# Altium PCB Basic Datalogger-v1.0.PcbDoc (part 2 of 2)
Units mil, origin at the board's own origin, x right, y up, seen from the top; angles counter-clockwise.
Board outline 1637.8 x 1745.25 mil, 2 copper layers (Top Layer, Bottom Layer), stack 57 mil thick; 64 components, 61 nets, 279 pads, 114 vias.
Unrouted connection lines stored in the file: 1.
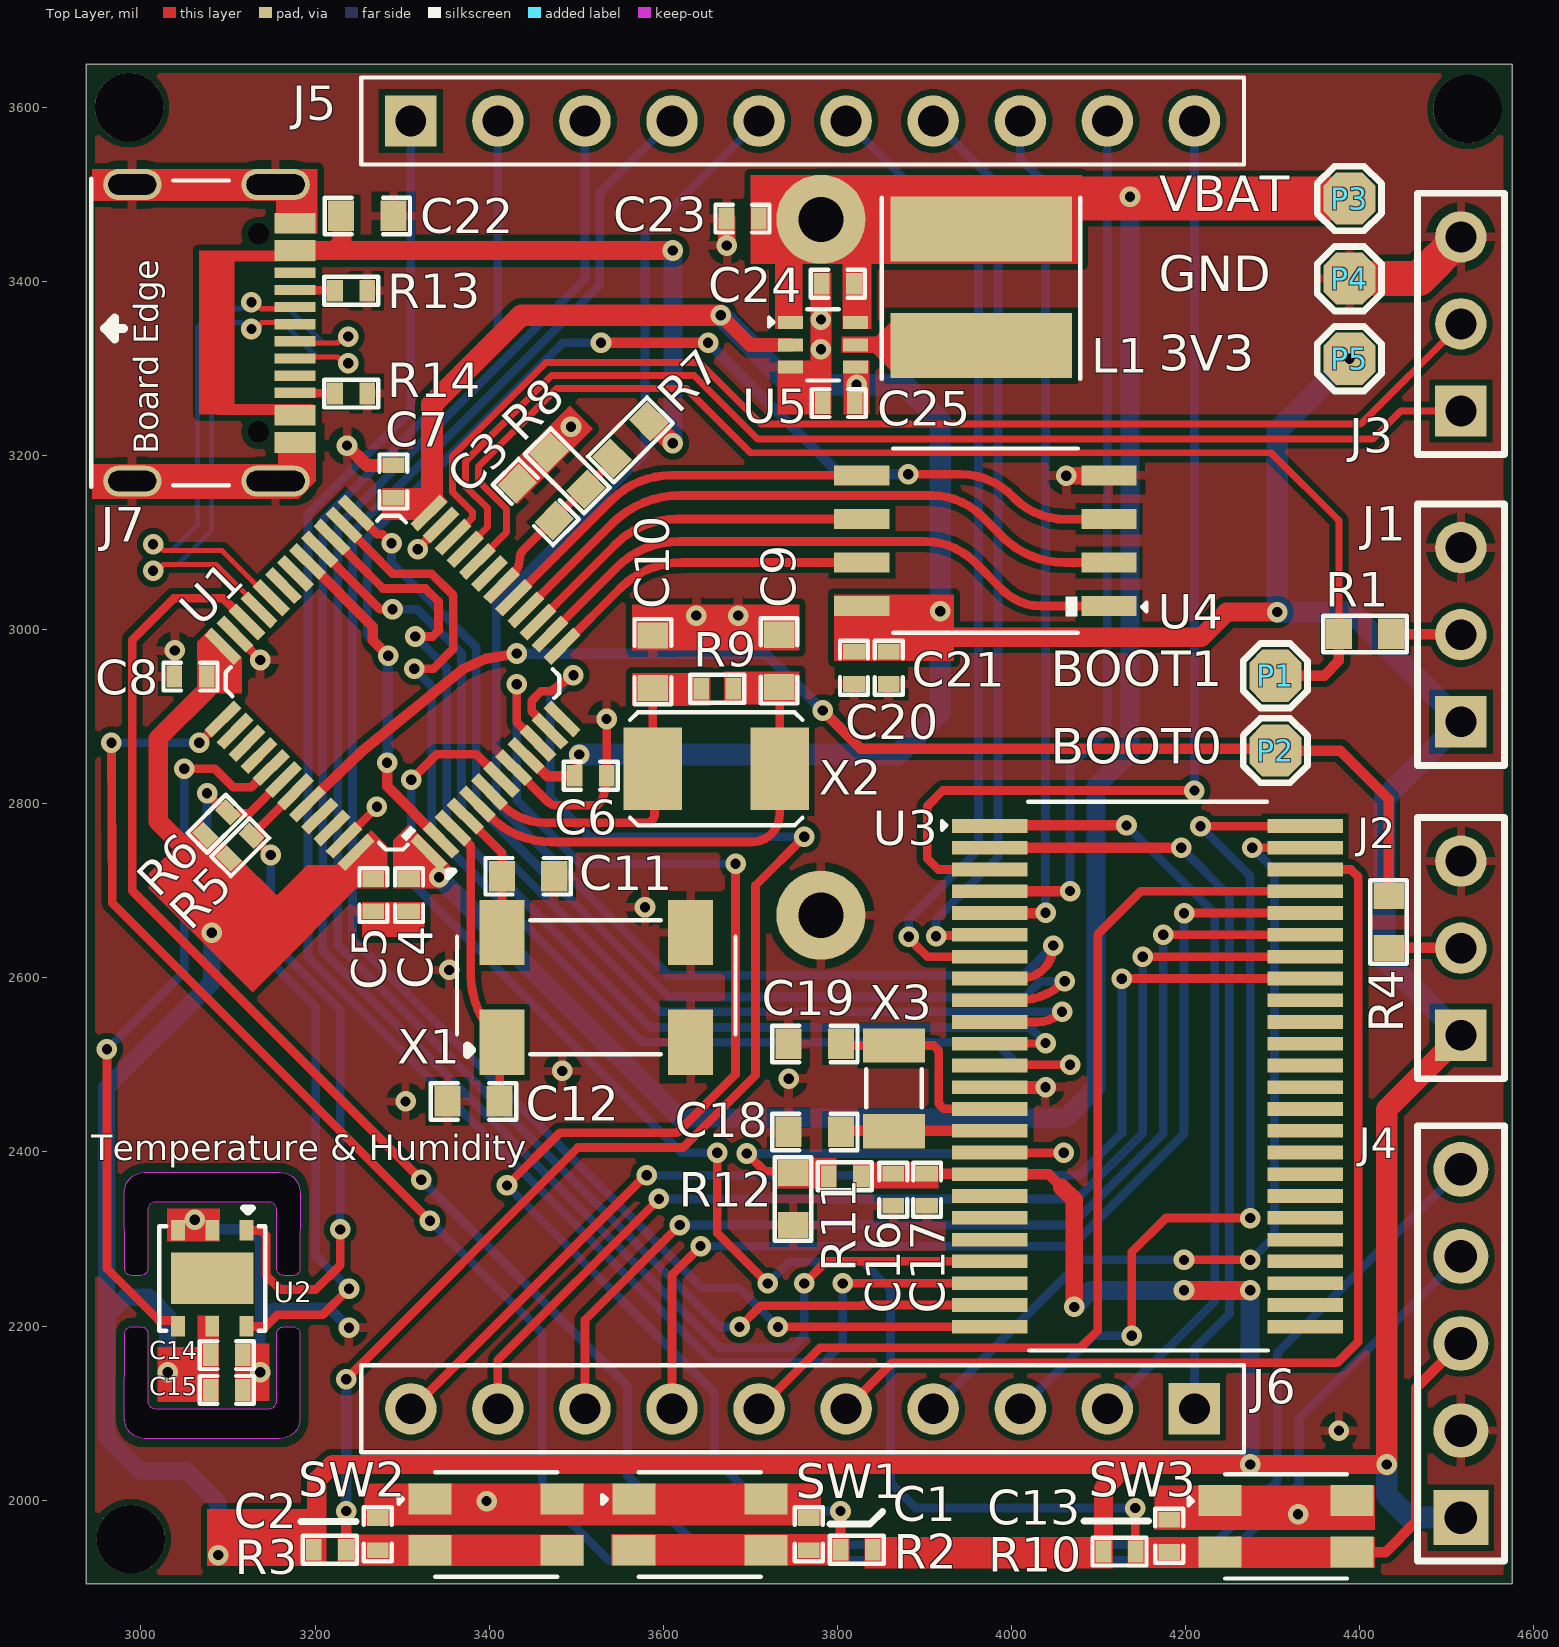
[diagram p0: Top Layer view]

## Via types
v1: diameter 23.62, hole 11.81, Top Layer to Bottom Layer, tented both sides, 113 vias
v2: diameter 23.62, hole 11.81, Top Layer to Bottom Layer, 1 vias

## Nets (pads, with @x,y where several pads share a name; then routed paths per layer and width w, separated by ;. In a path a pad name is that pad's centre, name@x,y a point inside that pad or via, vN(x,y) a via of type N, cw(c..) or ccw(c..) an arc to the next point about the centre after c; other vN are vias at no path point) (continued)
BUTTON2: (continued)
  Top Layer w10: v1(3236,2139) 3502,2405 3623,2405 3706,2488 3706,2706 v1(3762,2762) ; U1.11 3469.94,2885.16 3448.81,2906.29 3448.81,2918.19 3459.62,2929 3470.44,2929 3470.69,2929 v1(3496.81,2947.6)
  Top Layer w12: R3.1@3236,1943.5 v1(3236,1987.5)
  Bottom Layer w10: v1(3496.81,2947.6) 3470,2920.79 3470,2807 3515,2762 v1(3762,2762)
  Bottom Layer w12: v1(3236,1987.5) v1(3236,2139)
CS: U1.14 U4.1 | length 706.2
  Top Layer w10: U1.14 3546.97,3071.71 cw(c3617.68,3001) 3617.68,3101 3901,3101 cw(c3901,3021.33) 3957.33,3077.67 3989.62,3045.38 ccw(c4034,3089.77) 4034,3027 U4.1
CS_TN: U1.25 U3.9 | length 1264.1
  Top Layer w10: U1.25 U1.25@3259.75,3121.34 ; U1.25@3261.59,3121.34 U1.25@3259.75,3121.34 ; v1(3287.94,3098.99) 3277.43,3109.5 3271.6,3109.5 U1.25@3259.75,3121.34 ; U3.9 4008.59,2574.29 ccw(c4008.59,2648.41) v1(4061,2596)
  Bottom Layer w10: v1(3287.94,3098.99) 3287.94,3077.06 3385.21,2979.79 3385.21,2798.79 3606,2578 4015,2578 4033,2596 v1(4061,2596)
DAT_TN: U1.26 U3.12 | length 1410.3
  Top Layer w10: U1.26@3233.73,3119.95 3233.73,3119.53 3262.19,3091.07 3289.07,3064.19 3333.81,3064.19 3358.81,3039.19 3358.81,2977.81 3336,2955 v1(3314,2955) ; U3.12 4013.2,2496.42 4013.2,2500 v1(4067.19,2500)
  Top Layer w12: U1.26 U1.26@3233.73,3119.95
  Bottom Layer w10: v1(3314,2955) 3334.21,2934.79 3334.21,2767.79 3576,2526 3981,2526 4007,2500 v1(4067.19,2500)
DRDY: U1.41 U2.4 | length 840.2
  Top Layer w10: v1(2961,2518) 2961,2266.08 3020.7,2206.38 3039.76,2206.38 3042.63,2203.5 U2.4 ; v1(3049.81,2840) 3085,2840 3106,2819 3126.8,2819 U1.41@3149.37,2841.56
  Top Layer w12: U1.41@3149.37,2841.56 U1.41
  Bottom Layer w10: v1(2961,2518) 3049.81,2606.81 v1(3049.81,2840)
GND: C1.1 C2.1 C3.1 C4.1 C5.1 C6.1 C7.1 C8.1 C9.1 C10.1 C11.1 C12.1 C13.1 C14.1 C15.1 C16.1 C17.1 C18.1 C19.1 C20.1 C21.1 C22.1 C23.1 C24.1 C25.1 J1.3 J2.3 J3.3 J4.2 J7.A1/B12 J7.B1/A12 J7.S1 J7.S2 J7.S3 J7.S4 J8.2 P4.1 R8.1 R12.2 R13.2 R14.2 SW1.1 SW2.1 SW3.1 U1.8 U1.23 U1.35 U1.47 U2.2 U2.3 U3.13 U4.4 U5.3 X1.2 X1.3 | length 1151.6
  Top Layer w10: C8.1 3038.75,2946.25 3038.75,2975.75 v1(3039,2976) ; v1@3058,2311 3059,2311 v1@3060,2312 ; U1.35 3108.03,2994.32 3137,2965.35 v1(3137,2965) ; v1(3137.24,2147) 3139.24,2145 v1@3144,2145 ; U1.47 3233.31,2758.36 3271.13,2796.18 v1(3271.13,2796.5) ; 3287,2658 3287,2659 ; v1(3317.85,3092.27) 3317.85,3092.7 3344.66,3119.52 U1.23 ; U1.8 3468.03,2801.72 ccw(c3477,2810.69) 3477,2798 3523.77,2798 3529.63,2803.86 3534.84,2823.72 3534.84,2832 3534.92,2832.08 3534.92,2897.11 v1(3534.84,2897.19) ; v1(3638,3016) v1(3686,3016) ; v1@3742,2485 3743,2485 v1(3744,2484) ; U3.13 U3.13@3976.8,2476.19
  Top Layer w15: v1(3236.72,3211.28) 3259.5,3188.5 C7.1 ; U3.13@3975,2474.19 v1(4039,2474.19)
  Top Layer w20: v1(3673,3441) C23.1@3673,3471.5 ; v1(4062.81,3176.5) 4063.06,3176.75 4111.61,3176.75 U4.4
  Top Layer w40: P4.1 4468,3403 J3.3
  Bottom Layer w12: v1@3058,2311 3124,2311 3137.24,2297.76 3137.24,2206.24 ; v1(3137.24,2147) 3137.24,2206.24 ; v1(3239,2198) 3216,2221 3152,2221 3137.24,2206.24
  other v1: 4329,1984 3397,1999 4376,2080 3062,2322 3304,2458 3484,2493 3354,2609 3579,2681 3494,3233 3781,3322 3781,3356
HOLD: U1.13 U4.7 | length 379.7
  Top Layer w10: U1.13 3550.81,3047.71 cw(c3621.52,2977) 3621.52,3077 U4.7
MISO: U1.16 U4.2 | length 744.2
  Top Layer w10: U1.16 3541.29,3121.71 cw(c3619.25,3043.76) 3619.25,3154 3908,3154 cw(c3908,3071.92) 3966.04,3129.96 3989.71,3106.29 ccw(c4060.42,3177) 4060.42,3077 U4.2 U4.2@4111.36,3076.5
MOSI: U1.17 U4.5 | length 453.9
  Top Layer w10: U1.17 3441.75,3049.75 3540.96,3148.96 cw(c3608.66,3081.26) 3608.66,3177 U4.5
NetC3_2: C3.2 R7.1 R8.2 U1.18 | length 189
  Top Layer w10: U1.18 3428,3064.09 ccw(c3411.09,3081) 3435,3081 cw(c3449.49,3081) 3439.23,3091.23 ; 3441.24,3093.24 R7.1@3539.79,3191.79
NetJ1_2: J1.2 R1.1 | length 80.4
  Top Layer w12: R1.1 4436.5,2994.5 4515.5,2994.5 J1.2
NetJ2_2: J2.2 R4.2 | length 82.7
  Top Layer w12: R4.2@4433.5,2634.5 4515.5,2634.5 J2.2
NetJ3_1: J3.1 U1.21 | length 1349.1
  Top Layer w8: U1.21 3397.97,3117.58 3397.97,3139.34 3373,3164.31 3373,3193.21 3471.4,3291.61 3635.43,3291.61 3708.04,3219 4415,3219 4447,3251 J3.1
NetJ3_2: J3.2 U1.22 | length 1391.4
  Top Layer w8: U1.22 3380.9,3128.35 3380.9,3135.2 3358,3158.1 3358,3199.43 3465.18,3306.61 3641.65,3306.61 3712.25,3236 4401,3236 J3.2
NetJ7_A5: J7.A5 R13.1 | length 46.3
  Top Layer w10: J7.A5 3177.62,3389.5 3222.5,3389.5 R13.1
NetJ7_B5: J7.B5 R14.1 | length 46.2
  Top Layer w10: J7.B5 3177.57,3271.44 3222.56,3271.44 R14.1
NetL1_2: L1.2 U5.5
NetR11_1: R11.1 R12.1 U3.16 | length 555.1
  Top Layer w10: v1(3696,2398.19) 3716.44,2377.75 R11.1@3793.25,2377.75 ; U3.16@3975,2399.19 v1(4060,2399.19)
  Bottom Layer w10: v1(3696,2398.19) 4059,2398.19 v1(4060,2399.19)
OSC_IN: C9.2 R9.2 U1.5 X2.2 | length 526
  Top Layer w10: U1.5 3400.94,2785.29 ccw(c3471.65,2856) 3471.65,2756 3701.64,2756 ccw(c3701.64,2788.03) 3733.67,2788.03 X2.2 3733.67,2934 C9.2
OSC_OUT: C10.2 R9.1 U1.6 X2.1 | length 353.4
  Top Layer w10: U1.6 3416.32,2797.75 ccw(c3464,2845.44) 3464,2778 3580,2778 ccw(c3580,2788) 3590,2788 3590,2838 ccw(c3588,2838) X2.1 C10.2
OSCI_TN: C18.2 U3.15 X3.1 | length 170.9
  Top Layer w12: C18.2@3804,2424.29 U3.15
OSCO_TN: C19.2 U3.14 X3.2 | length 205.7
  Top Layer w10: C19.2@3817,2522.21 X3.2@3847,2522.21 ; X3.2 3910.42,2522.21 3916.28,2516.35 3916.28,2455.5 3922.14,2449.65 3974.54,2449.65 U3.14
P1: J5.2 U3.21 | length 2066.6
  Top Layer w10: v1(3762,2249) 3787.29,2274.29 U3.21
  Bottom Layer w10: J5.2 3410,3326.85 3209,3125.85 3209,2630.7 3664.51,2175.19 3748.19,2175.19 3762,2189 v1@3762,2248.29
P2: J5.1 U3.22 | length 2063.6
  Top Layer w10: v1@3806,2249.15 U3.22@3973.75,2249.15 ; U3.22@3973.75,2248.15 U3.22
  Bottom Layer w10: J5.1 3310,3250.89 3192,3132.89 3192,2623.66 3657.47,2158.19 3784.19,2158.19 3806,2180 v1(3806,2249) v1@3806,2249.15
P3: J5.3 U3.23 | length 2005
  Top Layer w10: v1(3687.59,2199) 3711.78,2223.19 3828.84,2223.19 3829.94,2224.29 U3.23
  Bottom Layer w10: J5.3 3510,3402.8 3226,3118.8 3226,2637.74 3664.74,2199 v1(3687.59,2199)
P4: J5.4 U3.24 | length 2007.8
  Top Layer w10: v1(3731.67,2199) 3731.82,2199.15 3974.75,2199.15 U3.24
  Bottom Layer w10: J5.4 3527,3501 3527,3395.76 3243,3111.76 3243,2645 3644,2244 3686.67,2244 v1(3731.67,2199)
P5: J5.5 U3.8 | length 1738.8
  Top Layer w10: U3.8 4010.29,2599.29 ccw(c4010.29,2637) v1(4048,2637)
  Bottom Layer w10: J5.5 3579,3453 3579,3201 3408,3030 3408,2801 3606,2603 4014,2603 v1(4048,2637)
P6: J5.6 U3.7 | length 1135.6
  Top Layer w10: v1(3882.06,2647.26) 3889.45,2637.95 3903.4,2624 U3.7@3974.61,2624
  Bottom Layer w10: J5.6 3962,3432 3962,2747 3882.06,2667.06 v1(3882.06,2647.26)
P7: J5.7 U3.6 | length 1058.9
  Top Layer w10: v1(3913.26,2647.81) 3914,2648.55 3974.16,2648.55 U3.6
  Bottom Layer w10: J5.7 3981.33,3513.66 cw(c3974.31,3506.54) 3981.38,3513.61 3984.31,3510.68 3984.31,2738.31 3913.26,2667.26 v1(3913.26,2647.81)
P8: J5.8 U3.5 | length 985.5
  Top Layer w12: U3.5 v1@4039,2674.29
  Bottom Layer w10: J5.8 4010,3541 4039,3512 v1(4039,2674.58)
P9: J5.9 U3.4 | length 994.3
  Top Layer w10: U3.4@3975.19,2699.58 U3.4@3975.33,2699.44 ; v1@4067.04,2699.44 v1(4067.19,2699.58)
  Top Layer w12: U3.4@3975.33,2699.44 v1@4067.04,2699.44
  Bottom Layer w10: v1(4067.19,2699.58) 4067.19,2842.19 4110,2885 J5.9
P10: J5.10 U3.3 | length 1220.6
  Top Layer w10: U3.3 3915.71,2724.29 3903,2737 3903,2797 3921,2815 v1(4210,2815)
  Bottom Layer w10: v1(4210,2815) J5.10
P11: J6.11 U3.2 | length 903.7
  Top Layer w12: U3.2 v1(4194.71,2749.29)
  Bottom Layer w10: v1(4194.71,2749.29) 4250.19,2693.81 4250.19,2214.19 4210,2174 J6.11
P12: J6.12 U3.1 | length 920.8
  Top Layer w10: U3.1 U3.1@3976.61,2776
  Top Layer w12: U3.1@3976.61,2775 v1(4132,2775)
  Bottom Layer w10: J6.12 4233.19,2228.19 4233.19,2673.81 v1(4132,2775)
P13: J6.13 U3.48 | length 1003.6
  Top Layer w10: v1(4138,2189) 4138,2285 4177,2324 v1(4274,2324) ; v1(4217,2774) 4217.15,2774.15 4335.81,2774.15 U3.48@4335.96,2774
  Bottom Layer w10: J6.13 4094,2189 v1(4138,2189) ; v1(4217,2774) 4274,2717 v1(4274,2324)
P14: J6.14 U3.47 | length 991.7
  Top Layer w10: v1(4198,2276) v1(4274,2276) ; v1@4276.36,2749.31 U3.47@4337.03,2749.31
  Bottom Layer w10: J6.14 4081,2276 v1(4198,2276) ; v1(4274,2276) 4275,2276 4302,2303 4302,2723.67 v1(4276.34,2749.34)
P15: J6.15 U3.46 | length 1218.2
  Top Layer w10: J6.15 3863,2158 4374,2158 4398,2182 4398,2716 4389.71,2724.29 U3.46
P16: J6.16 U3.45 | length 1139.8
  Top Layer w10: J6.16 3780,2175 4079,2175 4099,2195 4099,2650 4148.29,2699.29 U3.45
P17: J6.17 U3.44 | length 1201.5
  Top Layer w10: J6.17 3610,2259 v1(3642.84,2291.84) ; v1@4198.12,2674.29 U3.44
  Bottom Layer w10: v1(3642.84,2291.84) 4068.92,2291.84 4198.12,2421.04 v1(4198.12,2674.17) v1@4198.12,2674.29
P18: J6.18 U3.43 | length 1247.6
  Top Layer w10: J6.18 3510,2207 v1(3619,2316) ; v1(4174.31,2649.29) U3.43
  Bottom Layer w10: v1(3619,2316) 4069.04,2316 4174.31,2421.27 v1(4174.31,2649.29) v1@4174.31,2651
P19: J6.19 U3.42 | length 1293.5
  Top Layer w10: J6.19 3410,2161 v1(3595,2346) ; v1@4150.5,2624.29 U3.42
  Bottom Layer w10: v1(3595,2346) 4075,2346 4150.5,2421.5 v1(4150.5,2624)
P20: J6.20 U3.41 | length 1335.9
  Top Layer w10: J6.20 3311.5,2105 3579.68,2373.18 v1(3580.9,2373.18) ; v1(4126.69,2599) 4126.81,2599 4126.96,2599.15 4336.96,2599.15 U3.41
  Bottom Layer w10: v1(3580.9,2373.18) 4078.14,2373.18 4126.81,2421.85 4126.81,2599 v1(4126.69,2599)
PC14: C12.2 U1.3 X1.1 | length 334.9
  Top Layer w10: U1.3 3379,2751.55 3379,2603.16 ccw(c3479,2603.16) 3408.29,2532.45 X1.1 X1.1@3411.99,2526.01 ; C12.2 X1.1@3412,2525.28
PC15: C11.2 U1.4 X1.4 | length 151.4
  Top Layer w10: U1.4 3414.73,2743.65 C11.2 X1.4
RD_TN: U1.28 U3.10 | length 1266.5
  Top Layer w10: U1.28 3274.2,3023.38 v1(3289,3023.38) ; U3.10 4029.73,2549.29 ccw(c4029.73,2589.27) v1(4058,2561)
  Bottom Layer w10: v1(3289,3023.38) 3317.58,3023.38 3368.21,2972.75 3368.21,2788.79 3596,2561 v1(4058,2561)
RESET: C13.2 J4.3 R10.1 SW3.2 U1.7 | length 2088.5
  Top Layer w10: v1(3310.4,2827.4) 3339.69,2856.69 3385.21,2856.69 U1.7 ; v1(3662,2399) 3662,2307 v1(3720,2249) ; v1(4142,1991) 4142,1941 R10.1 4249.11,1941 4261.05,1952.94 4261.05,1954 4275.11,1939.94
  Top Layer w12: SW3.2@4391,1940.47 4429.47,1940.47 4465,1976 4465,2129 J4.3
  Bottom Layer w10: v1(3310.4,2827.4) 3310.4,2709.6 3621,2399 v1(3662,2399) ; v1(3720,2249) 3745,2274 3829,2274 3861,2242 3861,2020 3890,1991 v1(4142,1991)
SCK: U1.15 U4.6 | length 416.7
  Top Layer w10: U1.15 3545.13,3097.71 cw(c3615.84,3027) 3615.84,3127 U4.6
SCL: R6.2 U1.42 U2.6 | length 886.6
  Top Layer w10: v1(3076,2812) 3098,2790 R6.2 ; R6.2@3101.24,2788.76 3102.47,2787.53 3108.13,2787.53 3109.37,2788.76 3124.4,2788.76 U1.42@3163.29,2827.64 ; U2.6 3143.57,2199.57 3157,2213 3209,2213 v1(3239,2243)
  Top Layer w12: R6.2 R6.2@3101.24,2788.76 ; U1.42@3163.29,2827.64 U1.42
  Bottom Layer w10: v1(3076,2812) 3076,2691.57 3201,2566.57 3201,2281 v1(3239,2243)
SDA: R5.2 U1.43 U2.1 | length 796.2
  Top Layer w10: U2.1 3138.2,2309.8 3144.05,2303.95 3144.05,2257.78 3159.93,2241.9 3200.9,2241.9 3229,2270 v1(3229,2311) ; R5.2@3127.03,2763.13 U1.43 ; R5.2@3127.16,2763 R5.2@3129.56,2760.61 ; R5.2@3137.61,2763 3135.21,2760.61 R5.2@3129.56,2760.61 ; v1(3149.16,2741) R5.2@3129.56,2760.61
  Bottom Layer w10: v1(3149.16,2741) 3149.16,2642.45 3229,2562.61 v1(3229,2311) v1@3229,2305
SWCLK: J4.4 U1.37 | length 2482.1
  Top Layer w10: v1(2966.19,2870) 2967,2686 v1(3332,2321) ; v1(3067,2870) 3067,2870.06 U1.37 U1.37
  Bottom Layer w10: v1(2966.19,2870) v1(3067,2870) ; v1(3332,2321) 3461,2192 3461,2007 3537,1931 4242.33,1931 4330,2018.67 4330,2094 J4.4
SWDIO: J4.5 U1.34 | length 2613.2
  Top Layer w10: U1.34 3094.55,3036 3038,3036 2990,2988 2990,2700 v1(3322,2368)
  Bottom Layer w10: v1(3322,2368) 3559,2131 3559,2028 3638,1949 4232,1949 4305,2022 4305,2169 J4.5
USB_N: J7.A7 J7.B7 U1.32 | length 782.9
  Top Layer w6: v1(3014,3098) 3018.77,3098 3026.08,3090.69 3092.93,3090.69 3147.18,3036.44 U1.32 ; v1(3127,3375.78) 3130.82,3375.78 3138.13,3368.46 3175.28,3368.46 J7.B7 ; J7.A7@3175.28,3329.09 J7.A7 3178.97,3329.09 3225.92,3329.09 3233.23,3336.41 v1(3238,3336.41)
  Bottom Layer w6: v1(3014,3098) 3018.77,3098 3026.08,3090.69 3035.69,3090.69 3065,3120 3065,3347 3086.46,3368.46 3114.92,3368.46 3122.23,3375.78 v1(3127,3375.78) 3131.77,3375.78 3139.08,3368.46 3169.7,3368.46 3209.07,3329.09 3225.92,3329.09 3233.23,3336.41 v1(3238,3336.41)
USB_P: J7.A6 J7.B6 U1.33 | length 769.7
  Top Layer w6: v1(3014,3067.38) 3018.77,3067.38 3026.08,3074.69 3086.3,3074.69 3135.87,3025.12 U1.33 ; v1(3127,3345.15) 3131.69,3345.15 3139,3352.46 3175.28,3352.46 J7.A6 ; J7.B6@3175.28,3313.09 J7.B6 3178.97,3313.09 3225.92,3313.09 3233.23,3305.78 v1(3238,3305.78)
  Bottom Layer w6: v1(3014,3067.38) 3018.77,3067.38 3026.08,3074.69 3042.32,3074.69 3081,3113.37 3081,3340.37 3093.09,3352.46 3114.92,3352.46 3122.23,3345.15 v1(3127,3345.15) 3131.77,3345.15 3139.08,3352.46 3163.07,3352.46 3202.44,3313.09 3225.92,3313.09 3233.23,3305.78 v1(3238,3305.78)
VBAT: C4.2 C23.2 C24.2 J8.1 L1.1 P3.1 U1.1 U5.1 U5.6 | length 2262.7
  Top Layer w10: U5.1@3745.8,3352.8 U5.1
  Top Layer w50: L1.1@4048,3495 P3.1
  Bottom Layer w22: v1@3342.81,2715.19 3619,2439 4062,2439 4097,2474 4097,2586.53 4096.87,2586.65 4096.87,2611.35 4097,2611.47 4097,2820 4136,2859 v1(4136,3497.04)
  other v1: 3342.5,2715.5
WP: U1.2 U1.29 U4.3 | length 1553.8
  Top Layer w10: v1(3881.19,3178.19) 3941.24,3178.19 cw(c3941.24,3094.45) 4003,3151 ccw(c4062.15,3210.15) 4062.15,3126.5 U4.3@4111.36,3126.5
  Top Layer w12: U1.29 3266.55,3003.19 3266.55,2987.45 v1(3284,2970) ; v1(3282.73,2847.01) 3282.73,2819.97 U1.2 ; v1(3528.45,3329.42) v1(3651.42,3329.42)
  Bottom Layer w10: v1(3284,2970) 3260,2994 3260,3104.72 3484.7,3329.42 v1(3528.45,3329.42)
  Bottom Layer w12: v1@3282.73,2843.01 3283.44,2843.72 v1@3283.44,2969.44 ; v1(3651.42,3329.42) 3802.65,3178.19 v1(3881.19,3178.19)
WR_TN: U1.27 U3.11 | length 1307.8
  Top Layer w10: U1.27 3245.19,3080.23 3245.19,3080.1 3278.1,3047.19 3326.77,3047.19 3341.81,3032.15 3341.81,2998.81 3335,2992 v1(3315,2992) ; U3.11 4039.25,2524.72 v1@4039,2524.29 ; v1@4035.88,2524.29 ccw(c4035.88,2530.12) v1@4040,2526
  Bottom Layer w10: v1(3315,2992) 3351.21,2955.79 3351.21,2776.79 3585,2543 4021,2543 v1(4039,2525)
pads on no net: J7.A8 J7.B8 J7.MH U1.12 U1.19 U1.30 U1.31 U1.38 U1.39 U1.40 U1.45 U1.46 U2.7 U3.18 U3.19 U3.20 U3.25 U3.26 U3.27 U3.28 U3.29 U3.30 U3.31 U3.32 U3.33 U3.34 U3.35 U3.36 U3.37 U3.38 U3.39 U3.40

## Polygon pours and split planes (outlines as drawn)
GND on Bottom Layer "GND_L02_P001" (solid, remove dead copper, pour order 1): 2932.19,1904 2932.19,2525.01 2932.19,3649.25 cw(c2937.2,3649.25) 2937.2,3654.27 4575,3654.27 cw(c4575,3649.25) 4580.02,3649.25 4580.02,1904 cw(c4575,1904) 4575,1898.98 2937.2,1898.98 cw(c2937.2,1904)
GND on Top Layer "GND_L01_P000" (solid, remove dead copper, pour order 0): 2932.19,1904 2932.19,2525.01 2932.19,3649.25 cw(c2937.2,3649.25) 2937.2,3654.27 4575,3654.27 cw(c4575,3649.25) 4580.02,3649.25 4580.02,1904 cw(c4575,1904) 4575,1898.98 2937.2,1898.98 cw(c2937.2,1904)

## Other copper
Top Layer:
  rectangle net VBAT: 3728,3345 3760,3431
  rectangle net VBAT: 3700,3420 4081,3522
  rectangle net VBAT: 3806,3345 3839,3441
  rectangle net GND: 3254,2647 3326,2687
  rectangle net GND: 3731,3247 3793,3309
  rectangle net GND: 3769,3247 3793,3410
  rectangle net 3V3: 3807,3247 3837,3309
  rectangle net GND: 2944,3150 3160,3190
  rectangle net GND: 2944,3492 3202,3529
  rectangle net GND: 3155,3455 3203,3529
  region net GND: 3432.5,3143.5 3519.5,3230.5 3492.5,3257.5 3405.5,3170.5
  rectangle net GND: 3030,2297 3091,2335
  rectangle net 3V3: 3076,1924.53 3213,1990
  region net GND: 3781,2019 3257,2019 3257,1971 3781,1971
  region net 3V3: 4116.5,1957.47 3831,1957.47 3831,1921.47 4116.5,1921.47
  region net GND: 4417.21,2017 4164,2017 4164,1966 4417.21,1966
  region net RESET: 4417.21,1957.94 4133,1957.94 4133,1921.94 4417.21,1921.94
  rectangle net 3V3: 3019,2113 3090,2176
  rectangle net GND: 3108,2114 3148,2180
  rectangle net 3V3: 3065,2113 3090,2212
  region net NetR11_1: 3799,2393 3730,2393 3730,2358 3799,2358
  rectangle net 3V3: 3818,2358 3916,2388
  region net BUTTON2: 3509,1960.53 3226,1960.53 3226,1924.53 3509,1924.53
  rectangle net BUTTON1: 3540,1925 3814,1961
  rectangle net 3V3: 3796,2964 3934,3040
  region net GND: 3756.5,3029 3564,3029 3564,2976 3756.5,2976
  region net OSC_OUT: 3654,2950 3564,2950 3564,2912 3654,2912
  rectangle net OSC_IN: 3670,2914 3756.5,2952
  region net 3V3: 3137,2592 3254.5,2709.5 3233,2731 3226,2731 3224,2729 3191,2729 3095.5,2633.5
  region net 3V3: 3197.75,2652.75 3070,2780.5 3009,2719.5 3009,2703 3128.5,2583.5
  region net 3V3: 3226,2731 3263.29,2768.29 cw(c3265,2766.59) 3265,2769 3283,2751 3283,2703 3248,2703 3224,2727 3223,2728
  region net +5V: 3107,3246.72 3107,3435 3067,3435 3067,3247
  region net +5V: 3198.06,3246.73 3087,3246.73 3087,3258.73 3197.51,3258.73
  region net +5V: 3199.18,3423 3085,3423 3085,3435 3198.64,3435
  region net VBAT: 3307.5,2775.5 3362.5,2720.5 3345,2703 3290,2703 3290,2758
  region net NetL1_2: 3805,3336 3844,3336 3861,3353 4067,3353 4067,3302.86 3861,3298 3841,3318 3805,3318
  region net GND: 3158,3150 3181,3150 3201,3170 3201,3226 3158,3226
  region net 3V3: 3082,3001 3116,2967 3116,2931 3116,2927 3065,2927 3065,2986 3081,3002
  region net 3V3: 3352.5,3147.5 3331,3126 3277,3126 3277,3162 3338,3162
Bottom Layer:
  pour cut-out: 3010.73,2341.94 3010.73,2111.02 3152.87,2111.02 3152.87,2341.94

## Silkscreen, mask and mechanical layers (free items; w line width, h text height)
Top Overlay:
  lines w8: 3183.59,1975.62 3247,1975.62 ; 3791.59,1972.62 3837.62,1972.62 3852,1987 ; 4083,1976 4157,1976
  text "VBAT" at 4169.37,3466.78 h70
  text "GND" at 4169,3374.73 h70
  text "3V3" at 4168.9,3283.38 h70
  text "BOOT1" at 4045,2921 h70
  text "BOOT0" at 4045,2832 h70
  text "Temperature & Humidity" at 2943.24,2380.4 h50
Bottom Overlay:
  text "SWDIO" at 4478,2350 h70
  text "SWCLK" at 4477.65,2249.78 h70
  text "RESET" at 4477,2150 h70
  text "V1.0" at 3272.02,1910.78 h70
Board Outline:
  lines w4.72: 2983.4,2092.68 2983.84,2191.35 ; 2983.4,2354.68 2983.79,2266.02 ; 2983.7,2093.63 ccw(c3004.12,2093.63) 3004.12,2073.21 3109.6,2073.21 ; 2983.71,2191.35 cw(c2989.28,2191.35) 2989.28,2196.93 2999.95,2196.93 cw(c2999.95,2191.31) 3005.57,2191.31 3005.57,2113.54 ccw(c3016.25,2113.54) 3016.25,2102.86 3063.4,2102.86 3147.75,2102.86 ccw(c3147.75,2113.54) 3158.43,2113.54 3158.43,2191.31 cw(c3164.05,2191.31) 3164.05,2196.93 3174.83,2196.93 cw(c3174.83,2191.62) 3180.13,2191.62 3180.6,2092.68 ; 2983.71,2266.02 ccw(c2989.28,2266.02) 2989.28,2260.44 2999.95,2260.44 ccw(c2999.95,2266.06) 3005.57,2266.06 3005.57,2333.83 cw(c3016.25,2333.83) 3016.25,2344.51 3063.4,2344.51 3147.75,2344.51 cw(c3147.75,2333.83) 3158.43,2333.83 3158.43,2266.06 ccw(c3164.05,2266.06) 3164.05,2260.44 3174.83,2260.44 ccw(c3174.83,2265.75) 3180.13,2265.75 ; 2983.7,2353.74 cw(c3004.12,2353.74) 3004.12,2374.16 ; 3003.12,2374.16 3108.6,2374.16 ; 3101.01,2374.16 3158.88,2374.16 ; 3102.01,2073.21 3159.88,2073.21 ccw(c3159.88,2093.63) 3180.3,2093.63 ; 3159.88,2374.16 cw(c3159.88,2353.74) 3180.3,2353.74 ; 3180.2,2265.75 3180.6,2354.68
  lines w10: 2937.2,1904 4575,1904 4575,3649.25 2937.2,3649.25 2937.2,1904

## Text inside footprints (layer, text, board x,y; h text height)
J7: Top Overlay "Board Edge" at 3019.67,3201 h28 r90